# Altium PCB Dock_Chrgr.PcbDoc (part 2 of 2)
Units mil, origin at the board's own origin, x right, y up, seen from the top; angles counter-clockwise.
Board outline 3937.01 x 1574.8 mil, 2 copper layers (Top Layer, Bottom Layer); 76 components, 49 nets, 210 pads, 119 vias.
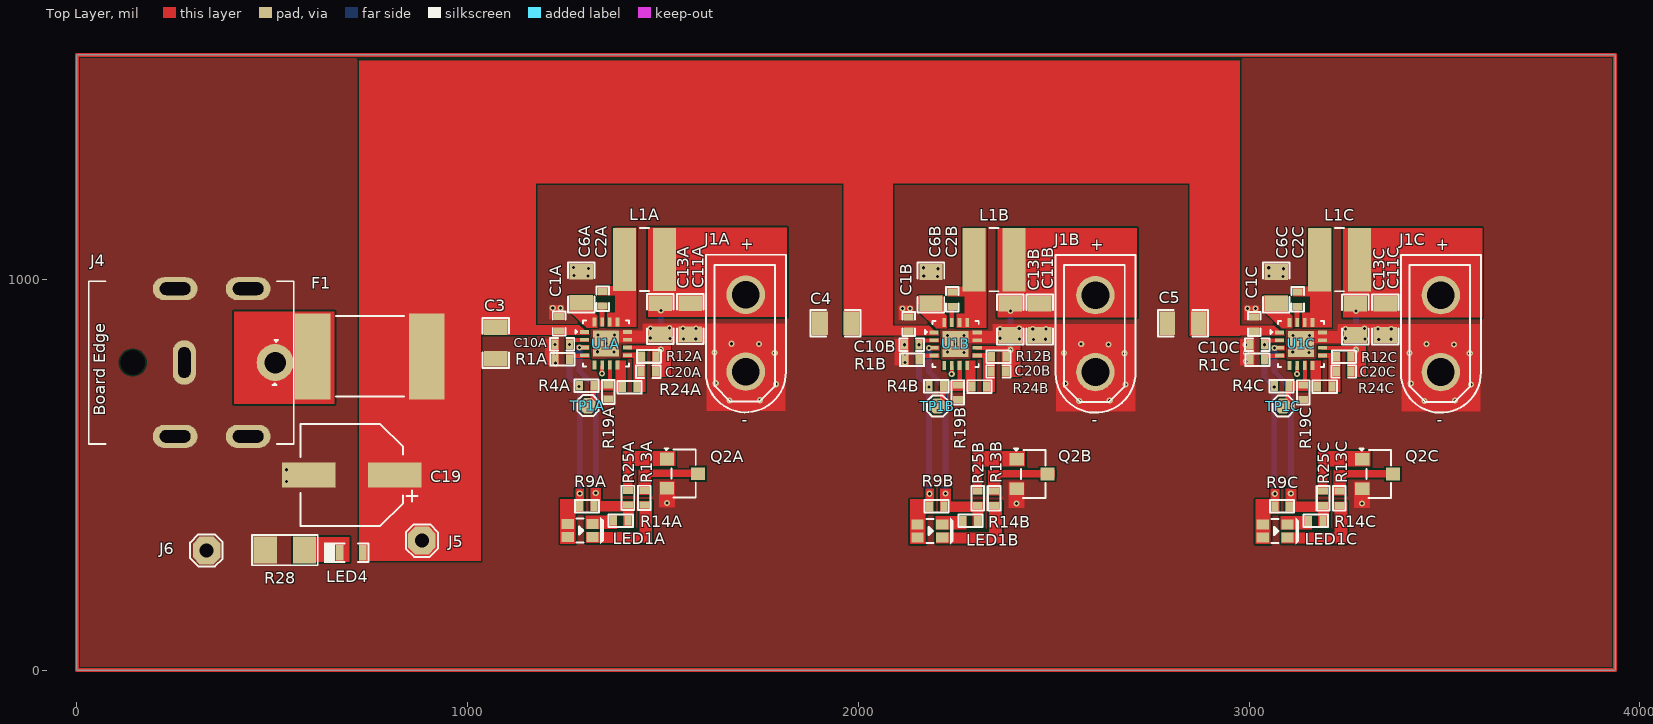
[diagram p0: Top Layer view]

## Via types
v1: diameter 15.75, hole 7.87, Top Layer to Bottom Layer, 119 vias

## Nets (pads, with @x,y where several pads share a name; then routed paths per layer and width w, separated by ;. In a path a pad name is that pad's centre, name@x,y a point inside that pad or via, vN(x,y) a via of type N, cw(c..) or ccw(c..) an arc to the next point about the centre after c; other vN are vias at no path point) (continued)
NetC2B_1: (continued)
  Top Layer w10: C2B.1@2240.31,930.32 C2B.1@2243,933
NetC2C_1: C2C.1 U1C.15 | length 3.8
  Top Layer w10: C2C.1@3124.31,930.32 C2C.1@3127,933
NetC6A_2: C6A.2 U1A.16
NetC6B_2: C6B.2 U1B.16
NetC6C_2: C6C.2 U1C.16
NetF1_1: F1.1 J4.1
NetLED1A_1: LED1A.1 R13A.2
NetLED1A_2: LED1A.2 R14A.2
NetLED1B_1: LED1B.1 R13B.2
NetLED1B_2: LED1B.2 R14B.2
NetLED1C_1: LED1C.1 R13C.2
NetLED1C_2: LED1C.2 R14C.2
NetLED4_2: LED4.2 R28.2
NetQ2A_1: Q2A.1 R25A.1
NetQ2A_3: Q2A.3 R13A.1
NetQ2B_1: Q2B.1 R25B.1
NetQ2B_3: Q2B.3 R13B.1
NetQ2C_1: Q2C.1 R25C.1
NetQ2C_3: Q2C.3 R13C.1
NetR1A_2: R1A.2 U1A.4
NetR1B_2: R1B.2 U1B.4
NetR1C_2: R1C.2 U1C.4
REGN1A: C10A.1 LED1A.3 LED1A.4 R4A.2 R9A.2 U1A.2 | length 392.4
  Bottom Layer w15: v1@1260.36,833.86 1260.36,751.14 v1(1285.5,726) 1285.5,725.8 1287,724.3 v1(1287,452.5)
  other v1: 1260.5,834
REGN1B: C10B.1 LED1B.3 LED1B.4 R4B.2 R9B.2 U1B.2 | length 392.4
  Bottom Layer w15: v1@2155.36,832.86 2155.36,750.14 v1(2180.5,725) 2180.5,453.2 2182,451.7 v1(2182,451.5)
  other v1: 2155.5,833
REGN1C: C10C.1 LED1C.3 LED1C.4 R4C.2 R9C.2 U1C.2 | length 392.4
  Bottom Layer w15: v1@3039.36,832.86 3039.36,750.14 v1(3064.5,725) 3064.5,453.2 3066,451.7 v1(3066,451.5)
  other v1: 3039.5,833
STAT1A: R9A.1 R14A.1 R25A.2 U1A.3 | length 389.9
  Bottom Layer w15: v1(1286,826) 1286,765.5 1328,723.5 v1(1328,453.5)
STAT1B: R9B.1 R14B.1 R25B.2 U1B.3 | length 389.9
  Bottom Layer w15: v1(2181,825) 2181,764.5 2223,722.5 v1(2223,452.5)
STAT1C: R9C.1 R14C.1 R25C.2 U1C.3 | length 389.9
  Bottom Layer w15: v1(3065,825) 3065,764.5 3107,722.5 v1(3107,452.5)
TS1A: R4A.1 R19A.2 TP1A.1 U1A.7
TS1B: R4B.1 R19B.2 TP1B.1 U1B.7
TS1C: R4C.1 R19C.2 TP1C.1 U1C.7
VSET_FB1A: C20A.1 R12A.1 R24A.2 U1A.9
VSET_FB1B: C20B.1 R12B.1 R24B.2 U1B.9
VSET_FB1C: C20C.1 R12C.1 R24C.2 U1C.9
pads on no net: J4.MH U1A.5 U1B.5 U1C.5
copper on no net: | length 22047.2
  Top Layer w10: 0,0 3937.01,0 3937.01,1574.8 0,1574.8 0,0
  Bottom Layer w10: 0,0 3937.01,0 3937.01,1574.8 0,1574.8 0,0

## Polygon pours and split planes (outlines as drawn)
GND on Bottom Layer "GND_L02_P000" (solid, pour order 0): 0,0 0,1574.8 3937.01,1574.8 3937.01,0
GND on Top Layer "GND_L01_P001" (solid, remove dead copper, pour order 1): 0,0 0,1574.8 3937.01,1574.8 3937.01,0

## Other copper
Top Layer:
  rectangle net REGN1A: 1237,323.5 1276.5,438.5
  rectangle net GND: 1198,780.5 1234.5,848
  rectangle net NetLED1A_1: 1439.5,325 1472.5,433
  rectangle net NetQ2A_1: 1397.5,522.5 1531.5,561.5
  rectangle net GND: 1611,663 1814,869
  rectangle net NetQ2A_3: 1437,494.5 1608,513
  rectangle net GND: 1448,839 1814,887.5
  rectangle net NetLED1A_1: 1303.5,325 1472.5,353.5
  rectangle net BAT1A: 1461.5,904 1818,1133
  rectangle net GND: 1489.5,416.5 1531,484.5
  rectangle net BAT1A: 1464,919 1534,1130.5
  rectangle net NetC2A_1: 1338,879.5 1350.5,941
  rectangle net IND_SW1A: 1376.9,878.07 1432.9,1132.57
  rectangle net IND_SW1A: 1356.5,878.07 1432.9,915.5
  rectangle net IND_SW1A: 1333.4,959.57 1384.9,983.57
  rectangle net VSET_FB1A: 1424,711.5 1455,813
  rectangle net GND: 1456.5,839 1530.5,887.5
  rectangle net GND: 1208,897 1246.5,935
  rectangle net GND: 1379.5,839 1714,869
  rectangle net TS1A: 1359,721 1370,793
  rectangle net BAT1A: 1472,751 1520,831
  rectangle net VSET_FB1A: 1397,799.5 1445.5,813
  rectangle net FB_GND1A: 1379,712 1405,793
  rectangle net NetLED1A_2: 1302,361.5 1382.5,396
  rectangle net STAT1A: 1397.5,364.5 1425.5,431.5
  rectangle net REGN1A: 1269.5,402 1298.5,438.5
  rectangle net STAT1A: 1314.5,405.5 1425,433
  rectangle net STAT1A: 1314.5,405.5 1342,466
  rectangle net STAT1A: 1279,819 1312.5,832
  rectangle net REGN1A: 1251.5,840 1311,850.5
  rectangle net NetR1A_2: 1252,799.5 1313,811
  rectangle net REGN1A: 1276.5,429.5 1298.5,465.5
  rectangle net NetQ2A_3: 1437,448.5 1469,512
  rectangle net TS1A: 1314,664.5 1328.5,741
  rectangle net TS1A: 1314,715.5 1372.5,741
  rectangle net NetQ2A_1: 1397.5,450.5 1421.5,561.5
  rectangle net NetLED4_2: 592.5,277 698,341
  rectangle net +12: 736,1246 2977.5,1560
  rectangle net +12: 722,279 1034.5,1560.5
  rectangle net IND_SW1C: 3135.5,876.5 3211.9,915
  rectangle net IND_SW1B: 2251.5,875.57 2327.9,913
  rectangle net REGN1B: 2146.5,839 2206,849.5
  rectangle net STAT1B: 2174,818 2207.5,831
  rectangle net NetR1B_2: 2147,798.5 2208,810
  rectangle net NetQ2B_1: 2292.5,449.5 2316.5,560.5
  rectangle net NetQ2B_3: 2332,493.5 2503,512
  rectangle net GND: 2384.5,415.5 2426,483.5
  rectangle net NetQ2B_3: 2332,447.5 2364,511
  rectangle net NetQ2B_1: 2292.5,521.5 2426.5,560.5
  rectangle net REGN1B: 2171.5,428.5 2193.5,464.5
  rectangle net STAT1B: 2209.5,404.5 2237,465
  rectangle net REGN1B: 2164.5,401 2193.5,437.5
  rectangle net VSET_FB1B: 2319,712 2350,812
  rectangle net VSET_FB1B: 2292,798.5 2340.5,812
  rectangle net FB_GND1B: 2274,713.5 2300,792
  rectangle net TS1B: 2254,720 2265,792
  rectangle net TS1B: 2209,714.5 2267.5,740
  rectangle net TS1B: 2209,663.5 2223.5,740
  rectangle net STAT1B: 2292.5,363.5 2320.5,430.5
  rectangle net STAT1B: 2209.5,404.5 2320,432
  rectangle net BAT1B: 2367,750 2415,830
  rectangle net GND: 2351.5,838 2425.5,886.5
  rectangle net BAT1B: 2359,918 2429,1129.5
  rectangle net GND: 2093,779.5 2129.5,847
  rectangle net GND: 2103,896 2141.5,934
  rectangle net NetC2B_1: 2233,878.5 2245.5,940
  rectangle net IND_SW1B: 2228.4,957 2279.9,982.57
  rectangle net BAT1B: 2356.5,903 2713,1132
  rectangle net IND_SW1B: 2271.9,877.07 2327.9,1131.57
  rectangle net GND: 2343,838 2709,886.5
  rectangle net GND: 2274.5,838 2609,868
  rectangle net GND: 2506,662 2709,868
  rectangle net NetLED1B_1: 2334.5,324 2367.5,432
  rectangle net REGN1B: 2132,322.5 2171.5,437.5
  rectangle net NetLED1B_2: 2197,360.5 2277.5,395
  rectangle net NetLED1B_1: 2198.5,324 2367.5,352.5
  rectangle net BAT1C: 3240.5,903 3597,1132
  rectangle net REGN1C: 3016,322.5 3055.5,437.5
  rectangle net NetQ2C_3: 3216,447.5 3248,511
  rectangle net GND: 3268.5,415.5 3310,483.5
  rectangle net NetQ2C_1: 3176.5,521.5 3310.5,560.5
  rectangle net NetQ2C_3: 3216,493.5 3387,512
  rectangle net IND_SW1C: 3155.9,877.07 3211.9,1131.57
  rectangle net REGN1C: 3030.5,839 3090,849.5
  rectangle net IND_SW1C: 3112.4,956.5 3163.9,982.57
  rectangle net NetR1C_2: 3031,798.5 3092,810
  rectangle net VSET_FB1C: 3176,798.5 3224.5,812
  rectangle net NetC2C_1: 3117,878.5 3129.5,940
  rectangle net TS1C: 3138,720 3149,792
  rectangle net VSET_FB1C: 3203,712 3234,812
  rectangle net FB_GND1C: 3158,713.5 3184,792
  rectangle net NetLED1C_2: 3081,360.5 3161.5,395
  rectangle net STAT1C: 3093.5,404.5 3204,432
  rectangle net NetLED1C_1: 3218.5,324 3251.5,432
  rectangle net STAT1C: 3176.5,363.5 3204.5,430.5
  rectangle net NetLED1C_1: 3082.5,324 3251.5,352.5
  rectangle net STAT1C: 3058,818 3091.5,831
  rectangle net BAT1C: 3243,918 3313,1129.5
  rectangle net BAT1C: 3251,750 3299,830
  rectangle net GND: 3390,662 3593,868
  rectangle net TS1C: 3093,714.5 3151.5,740
  rectangle net TS1C: 3093,663.5 3107.5,740
  rectangle net REGN1C: 3055.5,428.5 3077.5,464.5
  rectangle net STAT1C: 3093.5,404.5 3121,465
  rectangle net NetQ2C_1: 3176.5,449.5 3200.5,560.5
  rectangle net REGN1C: 3048.5,401 3077.5,437.5
  rectangle net GND: 3227,838 3593,886.5
  rectangle net GND: 3235.5,838 3309.5,886.5
  rectangle net GND: 3158.5,838 3493,868
  rectangle net GND: 2987,896 3025.5,934
  rectangle net GND: 2977,779.5 3013.5,847
  rectangle net +12: 1013.5,857.5 1175.5,1258
  rectangle net +12: 1962.5,856.5 2088.5,1258
  rectangle net +12: 2847.5,855.5 2977,1257
  rectangle net NetF1_1: 402,681.5 659.5,918.5
  region net +12: 1312.78,858.5 1171.44,858.5 1171.44,882.65 1285.96,882.65
  region net NetC6A_2: 1257.08,959 1320.5,959 1320.5,919 1332,907.5 1332,876.5 1305,876.5 1260.5,919
  region net +12: 2207.78,857.5 2066.44,857.5 2066.44,881.65 2180.96,881.65
  region net NetC6B_2: 2152.08,958 2215.5,958 2215.5,918 2227,906.5 2227,875.5 2200,875.5 2155.5,918
  region net NetC6C_2: 3036.08,958 3099.5,958 3099.5,918 3111,906.5 3111,875.5 3084,875.5 3039.5,918
  region net +12: 3091.78,857.5 2950.44,857.5 2950.44,881.65 3064.96,881.65

## Silkscreen, mask and mechanical layers (free items; w line width, h text height)
Board outline:
  the board outline again, w10

## Text inside footprints (layer, text, board x,y; h text height)
J1A: Top Overlay "+" at 1733.02,1103.09 h30 r180; Top Overlay "-" at 1701.98,627.49 h30
J1B: Top Overlay "+" at 2628.02,1102.09 h30 r180; Top Overlay "-" at 2596.98,626.49 h30
J1C: Top Overlay "-" at 3480.98,626.49 h30; Top Overlay "+" at 3512.02,1102.09 h30 r180
J4: Top Overlay "Board Edge" at 73.22,651.39 h30 r90